# Altium PCB Single_ETU_b_rev1.PcbDoc (part 3 of 6)
Units mil, origin at the board's own origin, x right, y up, seen from the top; angles counter-clockwise.
Board outline 5341 x 2710 mil, 10 copper layers (Top Layer, GND1, Signal 1, GND2, VDDA, VDD, GND3, Signal 2, GND4, Bottom Layer), stack 59.76 mil thick; 283 components, 478 nets, 1863 pads, 875 vias.
Unrouted connection lines stored in the file: 3.
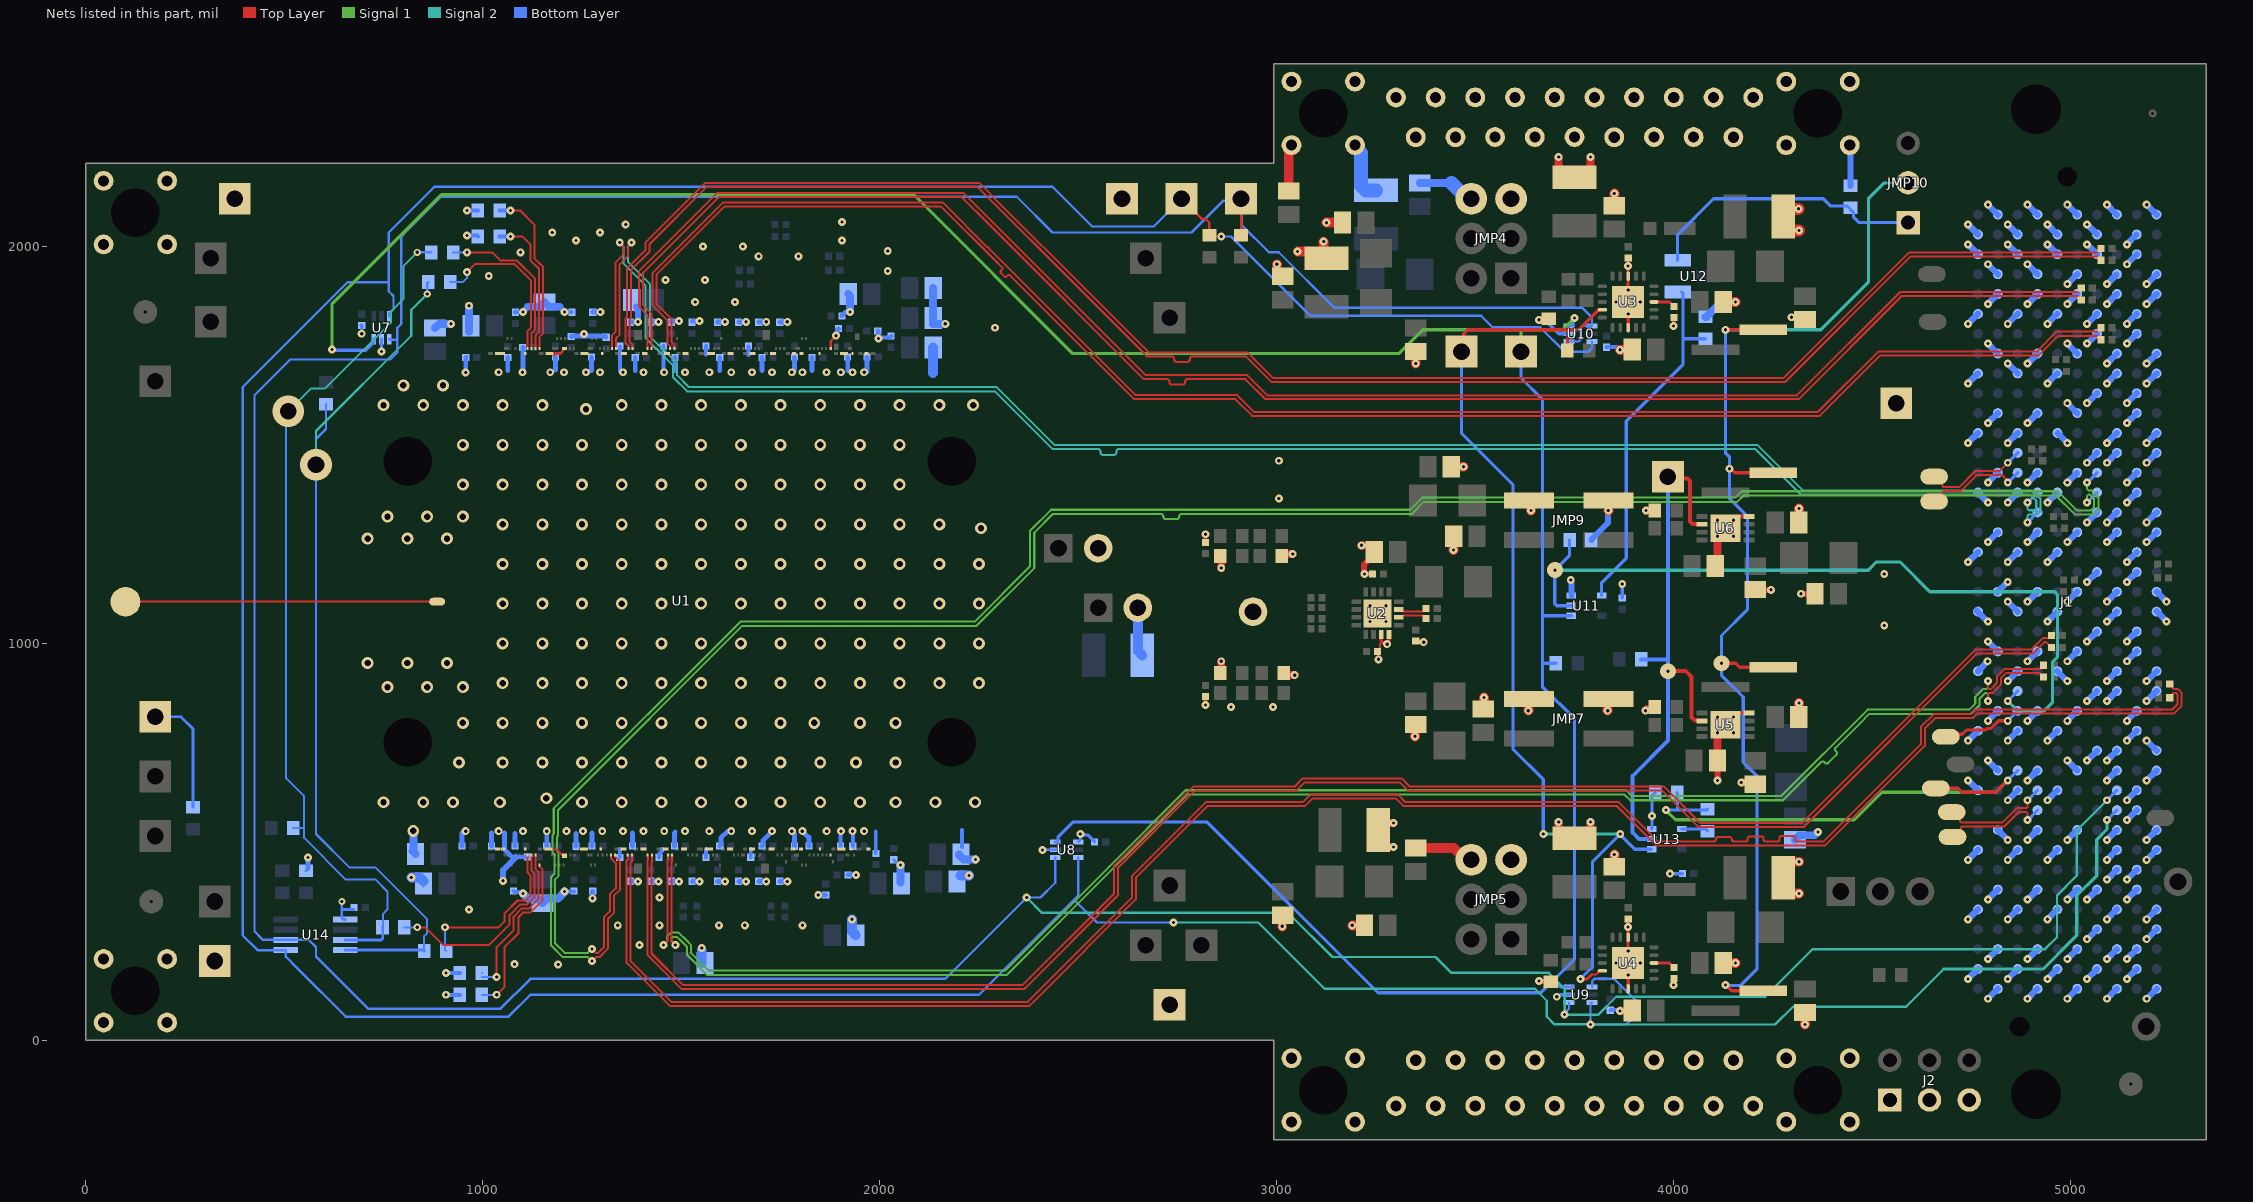
[diagram p11: the nets of this part, all layers, seen from the top]

## Via types
v1: diameter 20, hole 8, Top Layer to Bottom Layer, tented bottom, 402 vias
v2: diameter 20, hole 8, Top Layer to Bottom Layer, 199 vias
v3: diameter 30, hole 16, Top Layer to Bottom Layer, 160 vias
v4: diameter 20, hole 8, Top Layer to Bottom Layer, tented top, 89 vias
v5: diameter 18, hole 8, Top Layer to Bottom Layer, 6 vias
v6: diameter 18/25/25/25/25/18 (per signal layer), hole 8, Top Layer to Bottom Layer, tented bottom, 4 vias
v7: diameter 18/20/20/20/20/18 (per signal layer), hole 8, Top Layer to Bottom Layer, tented bottom, 4 vias
v8: diameter 80, hole 42, Top Layer to Bottom Layer, 2 vias
v9: diameter 18/25/25/25/25/18 (per signal layer), hole 8, Top Layer to Bottom Layer, 2 vias
v10: diameter 20/20/20/20/20/18 (per signal layer), hole 8, Top Layer to Bottom Layer, tented bottom, 2 vias
v11: diameter 40/20/20/20/20/40 (per signal layer), hole 8, Top Layer to Bottom Layer, 2 vias
v12: diameter 20/20/20/20/20/18 (per signal layer), hole 8, Top Layer to Bottom Layer, 1 vias
v13: diameter 40/20/20/20/20/40 (per signal layer), hole 8, Top Layer to Bottom Layer, tented top, 1 vias
v14: diameter 20, hole 8, Top Layer to Bottom Layer, tented both sides, 1 vias

## Nets (pads, with @x,y where several pads share a name; then routed paths per layer and width w, separated by ;. In a path a pad name is that pad's centre, name@x,y a point inside that pad or via, vN(x,y) a via of type N, cw(c..) or ccw(c..) an arc to the next point about the centre after c; other vN are vias at no path point) (continued)
GND: C1.2 C2.2 C3.2 C4.2 C5.2 C6.2 C7.2 C8.2 C9.2 C10.2 C11.2 C12.2 C13.2 C14.2 C15.2 C16.2 C17.2 C18.2 C19.2 C20.2 C21.2 C22.2 C23.2 C24.2 C25.2 C26.2 C27.2 C28.2 C29.2 C30.2 C31.2 C32.2 C33.2 C34.2 C35.2 C36.2 C37.2 C38.2 C39.2 C40.2 C41.2 C42.2 C43.2 C44.2 C45.2 C46.2 C47.2 C48.2 C49.2 C50.2 C51.2 C52.2 C53.2 C54.2 C55.2 C56.2 C57.2 C58.2 C59.2 C60.2 C61.2 C62.2 C63.2 C64.2 C65.2 C66.2 C67.2 C68.2 C69.2 C76.2 C77.2 C78.2 C79.2 C80.2 C81.2 C82.2 C83.2 C84.2 C85.2 C86.2 C87.2 C88.2 C89.2 C90.2 C93.2 C94.2 C95.2 C97.2 C98.2 C99.2 C100.2 C101.2 C102.2 C103.2 C104.2 C105.2 C106.2 C107.2 C108.2 C109.2 C110.2 C113.2 C114.2 C116.2 C117.2 C118.2 C119.2 C120.2 C121.2 C122.2 C123.2 C124.2 C125.2 C126.2 C128.2 C129.2 C130.2 C131.2 C132.2 C133.2 C134.2 C136.2 C137.2 C138.2 C139.2 C140.2 C157.2 C158.2 C159.2 C160.2 C161.2 C162.2 C163.2 C164.2 C175.2 C176.2 C177.2 C178.2 J1.A1 J1.A4 J1.A5 J1.A8 J1.A9 J1.A12 J1.A13 J1.A16 J1.A17 J1.A20 J1.A21 J1.A24 J1.A25 J1.A28 J1.A29 J1.A32 J1.A33 J1.A36 J1.A37 J1.A40 J1.B2 J1.B3 J1.B6 J1.B7 J1.B10 J1.B11 J1.B14 J1.B15 J1.B18 J1.B19 J1.B22 J1.B23 J1.B26 J1.B27 J1.B30 J1.B31 J1.B34 J1.B35 J1.B38 J1.B39 J1.C1 J1.C4 J1.C5 J1.C8 J1.C9 J1.C12 J1.C13 J1.C16 J1.C17 J1.C20 J1.C21 J1.C24 J1.C25 J1.C28 J1.C29 J1.C32 J1.C33 J1.C34 J1.C36 J1.C38 J1.C40 J1.D2 J1.D3 J1.D6 J1.D7 J1.D10 J1.D13 J1.D16 J1.D19 J1.D22 J1.D25 J1.D28 J1.D35 J1.D37 J1.D39 J1.E1 J1.E4 J1.E5 J1.E8 J1.E11 J1.E14 J1.E17 J1.E20 J1.E23 J1.E26 J1.E29 J1.E32 J1.E35 J1.E38 J1.E40 J1.F2 J1.F3 J1.F6 J1.F9 J1.F12 J1.F15 J1.F18 J1.F21 J1.F24 J1.F27 J1.F30 J1.F33 J1.F36 J1.F39 J1.G1 J1.G4 J1.G5 J1.G8 J1.G11 J1.G14 J1.G17 J1.G20 J1.G23 J1.G26 J1.G29 J1.G32 J1.G35 J1.G38 J1.G40 J1.H2 J1.H3 J1.H6 J1.H9 J1.H12 J1.H15 J1.H18 J1.H21 J1.H24 J1.H27 J1.H30 J1.H33 J1.H36 J1.H39 J1.J1 J1.J4 J1.J5 J1.J8 J1.J11 J1.J14 J1.J17 J1.J20 J1.J23 J1.J26 J1.J29 J1.J32 J1.J35 J1.J38 J1.J40 J1.K2 J1.K3 J1.K6 J1.K9 J1.K12 J1.K15 J1.K18 J1.K21 J1.K24 J1.K27 J1.K30 J1.K33 J1.K36 J1.K39 J2.1 J2.3 J2.5 J3.2 JMP4.5 JMP4.6 JMP5.5 JMP5.6 JMP7.3 JMP7.4 JMP9.3 JMP9.4 pad.1@45,45 pad.1@45,205 pad.1@45,2005 pad.1@45,2165 pad.1@205,45 pad.1@205,205 pad.1@205,2005 pad.1@205,2165 pad.1@3037,2255 pad.1@3037,2415 pad.1@3037,-45 pad.1@3037,-205 pad.1@3197,2255 pad.1@3197,2415 pad.1@3197,-45 pad.1@3197,-205 pad.1@3300,2375 pad.1@3300,-165 pad.1@3350,2275 pad.1@3350,-50 pad.1@3400,2375 pad.1@3400,-165 pad.1@3449.84,-49.68 pad.1@3450,2275 pad.1@3499.84,2375.32 pad.1@3499.84,-164.68 pad.1@3549.84,2275.32 pad.1@3549.84,-49.68 pad.1@3599.84,2375.32 pad.1@3599.84,-164.68 pad.1@3649.84,2275.32 pad.1@3649.84,-49.68 pad.1@3699.84,2375.32 pad.1@3699.84,-164.68 pad.1@3749.84,2275.32 pad.1@3750,-50 pad.1@3800,2375 pad.1@3800,-165 pad.1@3849.84,-49.68 pad.1@3850,2275 pad.1@3899.84,2375.32 pad.1@3899.84,-164.68 pad.1@3949.84,2275.32 pad.1@3949.84,-49.68 pad.1@3999.84,2375.32 pad.1@3999.84,-164.68 pad.1@4049.84,2275.32 pad.1@4050,-50 pad.1@4100,2375 pad.1@4100,-165 pad.1@4150,2275 pad.1@4150,-50 pad.1@4200,2375 pad.1@4200,-165 pad.1@4283,2255 pad.1@4283,2415 pad.1@4283,-45 pad.1@4283,-205 pad.1@4443,2255 pad.1@4443,2415 pad.1@4443,-45 pad.1@4443,-205 pad.4 R1.1 R2.1 R3.1 R8.1 R9.1 R10.1 R11.1 R12.1 R13.1 R14.1 R21.1 R22.1 R24.1 R26.1 R30.1 R33.1 R39.2 TP3.1 TP4.2 TP27.1 TP28.1 TP29.1 TP30.1 TP31.1 U1.3 U1.4 U1.5 U1.6 U1.14 U1.21 U1.22 U1.23 U1.24 U1.30 U1.35 U1.36 U1.37 U1.38 U1.44 U1.51 U1.52 U1.53 U1.59 U1.60 U1.61 U1.67 U1.68 U1.69 U1.75 U1.76 U1.77 U1.84 U1.85 U1.86 U1.87 U1.93 U1.94 U1.95 U1.101 U1.102 U1.103 U1.109 U1.110 U1.111 U1.117 U1.118 U1.121 U1.122 U1.128 U1.131 U1.135 U1.136 U1.137 U1.138 U1.141 U1.145 U1.146 U1.150 U1.151 U1.152 U1.153 U1.161 U1.168 U1.169 U1.170 U1.171 U1.177 U1.182 U1.183 U1.184 U1.185 U1.191 U1.198 U1.199 U1.200 U1.206 U1.207 U1.208 U1.214 U1.215 U1.216 U1.222 U1.223 U1.224 U1.231 U1.232 U1.233 U1.234 U1.240 U1.241 U1.242 U1.248 U1.249 U1.250 U1.256 U1.257 U1.258 U1.264 U1.265 U1.268 U1.269 U1.275 U1.278 U1.282 U1.283 U1.284 U1.285 U1.288 U1.292 U1.293 U2.7 U2.8 U2.17 U3.8 U3.18 U3.21 U3.V U4.8 U4.18 U4.C U4.V U5.4 U5.9 U6.4 U6.9 U7.2 U8.2 U8.4 U9.2 U10.2 U11.3 U13.3 U14.1 | length 13823.2
  Top Layer w6: U1.24@1173.5,481 1186.31,481 1199.81,467.5 ; U1.278@1876,1743 1876,1761 v1(1890,1775) ; v4@3255.5,961.5 3255.5,978.5 C69.2@3254,980 3260,986 3260,999 3263.74,1002.74 3267.22,1002.74
  Top Layer w7: 1178.56,1726 1183.06,1730.5 1195.34,1730.5 1207.34,1742.5 U1.177@1208.5,1742.5 ; U1.30@1200.34,467.5 U1.30@1208.5,467.5 ; U2.7@3263.39,1021.93 3262.48,1021.02 3262.48,1007.48 3271.96,998 3273,998 3275.71,998 3282.71,1005 U2.8@3282.68,1021.93
  Top Layer w8: U4.V@3884.72,220 v4(3884.72,285.62) C107.2@3884.72,306 ; U4.18@3884.72,260.24 U4.18@3885,259.96 ; U3.V@3884.72,1885 v4@3884.72,1955 ; U3.18@3884.72,1925.24 U3.18@3885,1924.96 ; v4(3884.72,1950.62) C88.2@3884.72,1971 ; U4.8@3885,130.04 U4.V@3885,164.49 ; U3.8@3885,1795.04 U3.V@3885,1829.49 ; v4@3999.74,139.73 C114.2@3999.74,155.74 ; U5.9@4130,795 v2(4150,815) 4159.53,824.53 U5.4@4189,824.53
  Top Layer w10: v4(2820,845) C164.2@2820,866 ; C163.2@2820,1254 v4(2820,1275) ; v4(3221,1175) C68.2@3241,1175 ; v4@3255.5,961.5 v4@3257,960 ; C76.2@3350.5,1003.5 v4@3369.5,1003.5 ; v4@3369.5,1005.5 v4@3370,1006 ; v4(3864.48,1739.47) 3894.94,1739.47 C94.2@3895.47,1740 ; v4(3999.48,139.47) v4@3999.74,139.73 ; v4(3999.48,1799.47) 3999.74,1799.73 C95.2@3999.74,1820.74 ; U6.9@4130,1290 v2(4150,1310) 4159.5,1319.5 U6.4@4189,1319.53
  Top Layer w12: C124.2@4200.47,650 C124.2@4205,645.47
  Top Layer w15: v4(3221,1175) 3220.04,1175.96 3220.04,1198.67 3245.47,1224.09 C67.2@3245.47,1230 ; v4@3660.96,149.04 3688.4,149.04 R26.1@3690,147.44 ; v2(4110,655) C125.2@4110,710 ; C132.2@4209.53,1135 v4(4245,1135) ; v4(4320,1125) C131.2@4355.47,1125
  Top Layer w20: R10.1@2860,931.68 v4(2860,955) ; v4(2860,1190) R9.1@2860,1213.32 ; R8.1@3016.68,1225 v4(3040,1225) ; R11.1@3021.68,920 v4(3045,920) ; v4(3213,1247) C67.2@3236.32,1247 ; v2(3293.62,487.41) 3273.02,487.41 3256.02,504.41 C103.2@3256.02,530 3273.44,547.41 v2(3293.62,547.41) ; v4(3660,1815) R24.1@3689.42,1815 ; C109.2@3710,527.18 v2(3710,550) ; C109.2@3710,537.18 3741.16,506.02 3750,506.02 3758.84,506.02 C109.2@3790,537.18 ; v2(3710,2225) 3710,2202.18 3741.16,2171.02 3758.84,2171.02 3790,2202.18 v2(3790,2225) ; C109.2@3790,527.18 v2(3790,550) ; JMP7.3@3833.43,858.43 JMP7.3@3835,860 ; v1(3864.48,74.47) 3894.94,74.47 C113.2@3895.47,75 ; v4(3928.43,830.47) 3932.96,835 R13.1@3958.26,835 ; v4(3930,1335) R14.1@3952.44,1335 ; C125.2@4110,710 v2(4110,775) U5.9@4130,795 ; C133.2@4110,1205 v2(4110,1270) ; v4(4170,650) C124.2@4200.47,650 ; v4(4296.2,1821.44) C80.2@4329.03,1821.44 ; C80.2@4329.03,1816.44 C80.2@4330,1815.47
  Top Layer w25: v4(3000,1955) 3000,1933.68 3009.15,1924.53 C85.2@3015,1924.53 ; v2(3013.62,287.41) 3013.62,314.1 C104.2@3015,315.47 ; C118.2@3030,2139.53 3030,2241.23 3037,2248.24 pad.1@3037,2255 ; v2@3052.97,1987.03 3090,1987.03 3107.03,1970 C84.2@3125,1970 ; C84.2@3118,1978.03 v4@3118,2011 ; v2(3125.24,2059.72) 3165.19,2059.72 C83.2@3165.47,2060 ; v2(3190,290) C110.2@3220.47,290 ; v4(3348.43,765.94) C126.2@3348.43,793.9 ; C102.2@3350,484.53 3445.59,484.53 3475.12,455 JMP5.6@3490,455 ; v4(3350,1705) C93.2@3350,1726.32 ; C134.2@3444.53,1445 v4(3470,1445) ; v4(3445,1235) C136.2@3445,1269.47 ; C128.2@3521.57,836.1 v4(3521.57,864.06) ; v4(3633.43,830.47) JMP7.4@3633.43,858.43 ; JMP9.4@3635,1360 3640,1355 v4(3640,1335) ; v4(3833.43,830.47) JMP7.3@3833.43,858.43 ; v4(3835,1335) JMP9.3@3835,1360 ; C108.2@3850,437.53 v2(3850,468) ; C89.2@3850,2102.53 v4(3850,2133) ; v4(3864.48,1739.47) C94.2@3893.9,1739.47 ; C101.2@4124.53,195 v4(4155,195) ; C82.2@4125.53,1860 v2(4155,1860) ; C138.2@4314.53,1300 C138.2@4315,1300.47 ; v4(4315,370) 4293.05,370 4276.02,387.03 C100.2@4276.02,410 4276.02,432.97 4293.05,450 v4(4315,450) ; C129.2@4315,815.47 v4(4315,850) ; C138.2@4315,1305.47 v4(4315,1340) ; v4(4330,40) C99.2@4330,70.47
  Top Layer w30: C81.2@4276.02,2075 4276.02,2080.13 4290.55,2094.65 v4(4314.35,2094.65) ; C81.2@4291.2,2040 v4(4315,2040)
  Signal 1 w20: v1(3864.48,74.47) v1@3865.01,75
  Bottom Layer w6: v1@2410.16,480.16 U8.2@2441.84,480.16 ; U8.4@2500,500 2505,505 v1(2505,520)
  Bottom Layer w7: TP3.1@175,815 240,815 270,785 R39.2@270,587.56 ; C177.2@555,427.56 C177.2@560.05,432.61 ; 645,330 C178.2@676,330 ; v5(645,350) 645,308.75 649.35,304.4 U14.1@653.8,304.4 ; C121.2@850.47,389.09 C121.2@850.47,395 C121.2@850.47,400.85 ; C162.2@2035,455 2040.5,449.5 2040.98,449.5 2048.48,442 v1(2052,442)
  Bottom Layer w8: v1(695,1780) C157.2@695,1801 ; v1(745,1735) U7.2@745,1766 ; C32.2@1990,471 1990,527 ; v1(2410,480) v1@2410.16,480.16 ; v1(2505,520) 2507.3,517.7 2523.3,517.7 2536,505 C158.2@2541,500 ; v4(3660,1815) 3675,1815 3710,1780 U10.2@3736,1780 ; v1(3705,110) 3708.25,110 3713.09,114.84 U9.2@3735.84,114.84 ; C159.2@3840,76 3841.07,77.07 3861.87,77.07 v1(3864.48,74.47) ; C175.2@3870,1114 v4(3870,1150) ; U13.3@3943.84,532.7 3945,533.85 v2(3945,565) 3945,616.38 R33.1@3953.03,624.41 ; v4(3990,420) C176.2@4022,420
  Bottom Layer w10: v1(907,115) R22.1@942.44,115 ; v1(907,170) R21.1@942.44,170 ; C34.2@957,1720 C34.2@958.5,1721.5 ; v1(960,2027) 985.44,2027 R1.1@987.44,2025 ; v1(960,2090) R2.1@987.44,2090 ; C3.2@1077,376 1079.5,373.5 v1@1100.5,373.5 ; C36.2@1082.5,1834.5 v1@1100.5,1834.5 ; 1084.07,462 C5.2@1113,462 ; v1@1205.5,375.5 C6.2@1230,375.5 ; v1@1205.5,1834.5 C39.2@1223.5,1834.5 ; C12.2@1345,461 1345,482 ; v2@1346,1685 C45.2@1346,1748 ; C16.2@1444,461 1444,470 1451,477 1451,482 ; v2@1455,1685 C49.2@1455,1749 ; C20.2@1562,461 1562,482 ; 1562,1728 C53.2@1562,1749 ; 1669,1727 C57.2@1669,1748 ; C24.2@1675,461 1675,482 ; C31.2@1901,489 v2@1901,525.11 ; C33.2@1932,489 v2@1932,526.82 ; v1(1997,1768) 1998.91,1769.91 2019.91,1769.91 2020,1770 2026,1770 C161.2@2030,1774 ; C120.2@2206.59,487.67 2206.59,529.57 ; C160.2@3830,1746 3857.95,1746 v4(3864.48,1739.47) ; v1@3861.77,74.47 v1(3864.48,74.47)
  Bottom Layer w12: C177.2@560.05,432.61 v1(560.05,460.49) ; C1.2@948,490 v2@948,522.98 ; v2@957,1687.02 C34.2@957,1720 ; C2.2@1022,490 1022,522.98 ; 1055,522.49 1055,480 1079,456 ; 1063,1687.02 C35.2@1063,1720 ; C4.2@1081,489 1081,521.98 ; C36.2@1082,1834 C36.2@1082.5,1834.5 ; v1@1100.5,1834.5 v1(1101,1835) ; v2@1101,1685.12 C37.2@1101,1745 ; C7.2@1161,490 v2@1161,522.98 ; 1183,1688.02 C38.2@1183,1721 ; v1@1205.5,1834.5 v1(1206,1835) ; C40.2@1223,1773 1224.47,1774.47 1260.19,1774.47 1260.66,1774 1300.97,1774 1308,1774 1310,1772 C43.2@1310,1771 ; C8.2@1235,489 1235,521.98 ; 1274,1687.02 C41.2@1274,1720 ; C10.2@1275,490 1275,522.98 ; v1(1276,358) 1276.5,358.5 1276.5,375.5 C9.2@1277,376 ; C42.2@1277,1834 1277.5,1834.5 1295.5,1834.5 v1(1296,1835) ; C44.2@1372,1809 1372.5,1809.5 1390.5,1809.5 v1(1391,1810) ; C11.2@1372.5,400.5 1390.5,400.5 v1(1391,400) ; C14.2@1377,490 1377,522.98 ; 1384,1687.02 C47.2@1384,1720 ; C46.2@1424,1809 1424.5,1809.5 1442.5,1809.5 v1(1443,1810) ; C13.2@1424.5,400.5 1442.5,400.5 v1(1443,400) ; C48.2@1475,1809 C48.2@1475.5,1809.5 ; C15.2@1475.5,400.5 1493.5,400.5 v1(1494,400) ; C48.2@1475.5,1811.5 v1@1493.5,1811.5 ; C18.2@1483,490 1483,523 1485,525 ; 1484,1687.02 C51.2@1484,1720 ; v1@1493.5,1809.5 v1@1494,1810 ; C17.2@1527.5,400.5 1545.5,400.5 v1(1546,400) ; C50.2@1527.5,1811.5 v1@1545.5,1811.5 ; v1@1545.5,1809.5 v1@1546,1810 ; C19.2@1591.5,400.5 1609.5,400.5 v1(1610,400) ; C52.2@1591.5,1809.5 1609.5,1809.5 v1(1610,1810) ; C22.2@1597,490 1600,493 1600,510 1617,527 v2(1625.92,527) ; 1597,1687.02 C55.2@1597,1720 ; C21.2@1644.5,400.5 1662.5,400.5 v1(1663,400) ; C54.2@1644.5,1809.5 1662.5,1809.5 v1(1663,1810) ; C23.2@1695.5,400.5 1713.5,400.5 v1(1714,400) ; C56.2@1695.5,1809.5 1713.5,1809.5 v1(1714,1810) ; C26.2@1703,490 1706,493 1706,504.14 v2(1728.86,527) ; 1703,1687.02 C59.2@1703,1720 ; C25.2@1748.5,400.5 1766.5,400.5 v1(1767,400) ; C58.2@1748.5,1809.5 1766.5,1809.5 v1(1767,1810) ; v2(1778.37,527) 1785,520.37 C27.2@1785,489 ; v2@1785,1688.02 C60.2@1785,1721 ; v2(1804.81,527) 1819,512.81 ; C30.2@1822,490 1822,512.81 ; 1829,1687.02 C63.2@1829,1720 ; v1(1845,366) C28.2@1864,366 ; v1@1890,1777.16 1893,1780.16 C62.2@1893,1789 ; C62.2@1893,1790 C62.2@1893,1789 ; C62.2@1896,1792 C62.2@1893,1789 ; v2@1898,1686.87 v2(1901.86,1683) ; v2@1900,525.11 v2(1901.89,527) ; C61.2@1904,1825 1914,1835 v1@1920,1835 ; 1919,1686.87 C64.2@1919,1721 ; C29.2@1920,417 v10(1940,417) ; v2@1968,1683 C66.2@1968,1720 ; C65.2@1995,1787 1996,1786 1996,1769 v1(1997,1768)
  Bottom Layer w15: v1(1051,402) 1051,428.93 1084.07,462 ; v1(1101,1835) 1113.87,1847.87 ; 1193.13,1847.87 v1(1206,1835) ; C98.2@1385.47,1849.1 1389.63,1844.94 1389.63,1837.53 1391,1836.15 v1(1391,1810) ; v4(3740.33,1159.46) 3740.33,1158.11 3742,1156.44 U11.3@3742,1120.5 ; R3.1@3792.56,1260 3792.56,1261.97 3834.04,1303.45 3834.04,1334.04 v4(3835,1335) ; pad.1@4443,2255 4445,2253 R30.1@4445,2152.43
  Bottom Layer w16: v1@4740,2006 J1.K3@4765,1981 ; v1(4741,155) J1.K39@4766,180 ; v1(4741,305) J1.K36@4766,330 ; v1(4741,455) J1.K33@4766,480 ; v1(4741,655) J1.K30@4766,630 ; v1(4741,755) J1.K27@4766,780 ; v1(4741,1205) J1.K18@4766,1230 ; v1(4741,1505) J1.K12@4766,1530 ; v1(4741,1655) J1.K9@4766,1680 ; v1(4741,1805) J1.K6@4766,1830 ; v1(4741,2055) J1.K2@4766,2030 ; J1.K21@4763,1082 v1@4788,1057 ; J1.K24@4766,930 v1@4791,955 ; J1.K15@4766,1380 v1(4791,1355) ; v1@4790,1756 J1.J8@4815,1731 ; v1(4791,105) J1.J40@4816,130 ; v1(4791,205) J1.J38@4816,230 ; v1(4791,355) J1.J35@4816,380 ; v1(4791,705) J1.J29@4816,680 ; v1(4791,805) J1.J26@4816,830 ; v1(4791,1005) J1.J23@4816,980 ; v1(4791,1255) J1.J17@4816,1280 ; v1(4791,1405) J1.J14@4816,1430 ; v1(4791,1555) J1.J11@4816,1580 ; v1(4791,1855) J1.J5@4816,1880 ; v1(4791,1955) J1.J4@4816,1930 ; v1(4791,2105) J1.J1@4816,2080 ; J1.J20@4815,1129 J1.J20@4816,1130 v1@4840,1154 ; J1.J32@4816,530 v1(4841,505) ; v1@4840,2006 J1.H3@4865,1981 ; v1(4841,155) J1.H39@4866,180 ; v1(4841,305) J1.H36@4866,330 ; v1(4841,455) J1.H33@4866,480 ; v1(4841,605) J1.H30@4866,630 ; v1(4841,755) J1.H27@4866,780 ; v1(4841,905) J1.H24@4866,930 ; v1(4841,1105) J1.H21@4866,1080 ; v1(4841,1205) J1.H18@4866,1230 ; v1(4841,1355) J1.H15@4866,1380 ; v1(4841,1505) J1.H12@4866,1530 ; v1(4841,1705) J1.H9@4866,1680 ; v1(4841,1805) J1.H6@4866,1830 ; v1(4841,2055) J1.H2@4866,2030 ; v1@4890.75,105 J1.G40@4915.75,130 ; v1(4891,205) J1.G38@4916,230 ; v1(4891,355) J1.G35@4916,380 ; v1(4891,505) J1.G32@4916,530 ; v1(4891,655) J1.G29@4916,680 ; v1(4891,805) J1.G26@4916,830 ; v1(4891,955) J1.G23@4916,980 ; v1(4891,1105) J1.G20@4916,1130 ; v1(4891,1255) J1.G17@4916,1280 ; v1(4891,1405) J1.G14@4916,1430 ; v1(4891,1555) J1.G11@4916,1580 ; v1(4891,1705) J1.G8@4916,1730 ; v1(4891,1855) J1.G5@4916,1880 ; v1(4891,1955) J1.G4@4916,1930 ; v1(4891,2105) J1.G1@4916,2080 ; v1@4940,1354 J1.F15@4965,1379 ; v1@4940,2006 J1.F3@4965,1981 ; v1(4941,155) J1.F39@4966,180 ; v1(4941,305) J1.F36@4966,330 ; v1(4941,455) J1.F33@4966,480 ; v1(4941,605) J1.F30@4966,630 ; v1(4941,755) J1.F27@4966,780 ; v1@4941,1056 v1(4941,1055) J1.F21@4966,1080 ; v1(4941,1205) J1.F18@4966,1230 ; v1(4941,1655) J1.F9@4966,1680 ; v1(4941,1805) J1.F6@4966,1830 ; v1(4941,2055) J1.F2@4966,2030 ; J1.F24@4966,930 v1(4991,905) ; J1.F12@4967,1529 v1@4992,1504 ; v1@4990,1404 J1.E14@5015,1429 ; v1(4991,105) J1.E40@5016,130 ; v1(4991,205) J1.E38@5016,230 ; v1(4991,355) J1.E35@5016,380 ; v1(4991,505) J1.E32@5016,530 ; v1(4991,705) J1.E29@5016,680 ; v1(4991,805) J1.E26@5016,830 ; v1(4991,955) J1.E23@5016,980 ; v14(4991,1105) J1.E20@5016,1130 ; v1(4991,1255) J1.E17@5016,1280 ; v1(4991,1605) J1.E11@5016,1580 ; v1(4991,1755) J1.E8@5016,1730 ; v1(4991,1855) J1.E5@5016,1880 ; v1(4991,1905) J1.E4@5016,1930 ; v1(4991,2105) J1.E1@5016,2080 ; v1(5041,155) J1.D39@5066,180 ; v1(5041,255) J1.D37@5066,280 ; v1(5041,355) J1.D35@5066,380 ; v1(5041,705) J1.D28@5066,730 ; v1(5041,855) J1.D25@5066,880 ; v1(5041,1005) J1.D22@5066,1030 ; v1(5041,1155) J1.D19@5066,1180 ; v1(5041,1305) J1.D16@5066,1330 ; v1(5041,1455) J1.D13@5066,1480 ; v1(5041,1605) J1.D10@5066,1630 ; v1(5041,1755) J1.D7@5066,1780 ; v1(5041,1805) J1.D6@5066,1830 ; v1(5041,2005) J1.D3@5066,1980 ; v1(5041,2055) J1.D2@5066,2030 ; v1@5090,1904 J1.C4@5115,1929 ; v1(5091,105) J1.C40@5116,130 ; v1(5091,205) J1.C38@5116,230 ; v1(5091,305) J1.C36@5116,330 ; v1(5091,405) J1.C34@5116,430 ; v1(5091,455) J1.C33@5116,480 ; v1(5091,505) J1.C32@5116,530 ; v1(5091,655) J1.C29@5116,680 ; v1(5091,705) J1.C28@5116,730 ; v1(5091,855) J1.C25@5116,880 ; v1(5091,905) J1.C24@5116,930 ; v1(5091,1055) J1.C21@5116,1080 ; v1(5091,1105) J1.C20@5116,1130 ; v1(5091,1255) J1.C17@5116,1280 ; v1(5091,1305) J1.C16@5116,1330 ; v1(5091,1455) J1.C13@5116,1480 ; v1(5091,1505) J1.C12@5116,1530 ; v1(5091,1655) J1.C9@5116,1680 ; v1(5091,1705) J1.C8@5116,1730 ; v1(5091,1855) J1.C5@5116,1880 ; v1(5091,2105) J1.C1@5116,2080 ; v1@5140,2004 J1.B2@5165,2029 ; v1(5141,155) J1.B39@5166,180 ; v1(5141,205) J1.B38@5166,230 ; v1(5141,355) J1.B35@5166,380 ; v1(5141,405) J1.B34@5166,430 ; v1(5141,555) J1.B31@5166,580 ; v1(5141,605) J1.B30@5166,630 ; v1(5141,755) J1.B27@5166,780 ; v1(5141,805) J1.B26@5166,830 ; v1(5141,955) J1.B23@5166,980 ; v1(5141,1005) J1.B22@5166,1030 ; v1(5141,1155) J1.B19@5166,1180 ; v1(5141,1205) J1.B18@5166,1230 ; v1(5141,1355) J1.B15@5166,1380 ; v1(5141,1405) J1.B14@5166,1430 ; v1(5141,1555) J1.B11@5166,1580 ; v1(5141,1605) J1.B10@5166,1630 ; v1(5141,1755) J1.B7@5166,1780 ; v1(5141,1805) J1.B6@5166,1830 ; v1(5141,1955) J1.B3@5166,1980 ; v1(5191,105) J1.A40@5216,130 ; v1(5191,255) J1.A37@5216,280 ; v1(5191,305) J1.A36@5216,330 ; v1(5191,455) J1.A33@5216,480 ; v1(5191,505) J1.A32@5216,530 ; v1(5191,655) J1.A29@5216,680 ; v1(5191,755) J1.A28@5216,730 ; v1(5191,855) J1.A25@5216,880 ; v1(5191,905) J1.A24@5216,930 ; v1(5191,1255) J1.A17@5216,1280 ; v1(5191,1305) J1.A16@5216,1330 ; v1(5191,1455) J1.A13@5216,1480 ; v1(5191,1505) J1.A12@5216,1530 ; v1(5191,1655) J1.A9@5216,1680 ; v1(5191,1705) J1.A8@5216,1730 ; v1(5191,1855) J1.A5@5216,1880 ; v1(5191,1905) J1.A4@5216,1930 ; v1(5191,2105) J1.A1@5216,2080 ; J1.A21@5216,1081 v1@5241,1056 ; J1.A20@5216,1130 v1(5241,1105)
  Bottom Layer w20: v3(825,528) 825,479.47 823,477.47 C119.2@830.47,470 ; C78.2@880,1794.53 890.47,1805 v1(920,1805) ; C86.2@965,1785 v2(965,1850.47) ; v1(1101,370) 1115,356 1139.47,356 C130.2@1150,345.47 1161.65,357.13 1189.41,357.13 1206,373.72 v1(1206,375) ; 1113.87,1847.87 1143.35,1847.87 C97.2@1155,1859.53 1166.65,1847.87 1193.13,1847.87 ; C105.2@1920.47,1880 1925,1875.47 v1(1925,1835) ; C140.2@2052,397.47 v1(2052,442) ; C87.2@2134.53,1805 C106.2@2134.53,1895 ; C87.2@2135,1805 v1@2161.47,1805 ; C120.2@2199.53,469 2199.53,467.19 2211.18,455.54 v1(2241.06,455.54) ; C116.2@3360,2159.53 3440.06,2159.53 ; R12.1@4080,1822.56 4081.97,1822.56 4119.41,1860 v2(4155,1860) ; C123.2@4305,505.47 4316.29,516.76 4354.76,516.76 v2(4363,525)
  Bottom Layer w25: v1(820,410) 841.32,410 C121.2@850.47,400.85 ; C137.2@1551.53,195 v1@1551.53,227.56 ; v1(1930,305) 1930.37,304.63 1930.37,274.15 C139.2@1939.53,265 ; 2134,1681 C79.2@2134,1745 ; C122.2@2203.68,415 v1(2225,415) ; J3.2@2650,1090 2650,981.02 C77.2@2661.02,970
  Bottom Layer w35: pad.1@3197,2255 3197,2250.94 3212.38,2235.56 3212.38,2153.05 3224.41,2141.02 C117.2@3250,2141.02 ; 3440.06,2159.53 3479.59,2120 JMP4.6@3490,2120
  other v1: 4891,105 1551.53,232.56 4790.52,955.05 4791,1055 5241,1055 4841,1155 4941,1355 4991,1405 4991,1505 4791,1755 2165,1805 1494,1812 1546,1812 5091,1905 4741,2005 4841,2005 4941,2005 5141,2005
  other v2: 1190,191 1080,192 1395,240 1340,290 1445,290 1595,290 1660,290 1805,290 965,330 1445,360 957,527 1040.11,527 1101,527 1161.14,527 1210.74,527 1252.04,527 1301,527 1353.09,527 1405.05,527 1457.02,527 1508.99,527 1570.55,527 1677.89,527 1866.28,527 1931,527 1960.72,527 4150,775 4110,815 4530,1045 3235,1055 3275,1055 3235,1095 3275,1095 4530,1175 4150,1270 4110,1310 3005,1365 3005,1460 957,1682 1040.09,1683 1100,1683 1170,1683 1205,1683 1260,1683 1295,1683 1353.06,1683 1405.03,1683 1457,1683 1508.97,1683 1570.53,1683 1625.9,1683 1677.87,1683 1728.83,1683 1778.35,1683 1804.79,1683 1866,1683 1930.98,1683 1960.69,1683 1255,1779 2290,1795 1535,1860 1635,1860 1460,1915 1560,1915 1015,1925 2020,1938 1695,1975 1795,1975 1095,1985 3051.97,1987.03 2020,1988 1555,2000 1655,2000 1235,2015 1905,2015 1175,2035 1295,2035 1360,2055 1905,2061
  other v3: 750,600 850,600 925,600 1043,600 1250,600 1350,600 1450,600 1550,600 1650,600 1750,600 1850,600 1950,600 2040,600 2140,600 2240,600 1160,610 940,700 1050,700 1150,700 1250,700 1350,700 1450,700 1550,700 1650,700 1750,700 1850,700 1940,700 2040,700 950,800 1050,800 1150,800 1250,800 1350,800 1450,800 1550,800 1650,800 1750,800 1835,800 1950,800 2040,800 760,890 860,890 950,890 1050,900 1150,900 1250,900 1350,900 1450,900 1550,900 1650,900 1750,900 1850,900 1950,900 2050,900 2150,900 2250,900 710,950.63 810,950.63 910,950.63 1050,1000 1150,1000 1250,1000 1350,1000 1450,1000 1550,1000 1650,1000 1750,1000 1850,1000 1950,1000 2050,1000 2150,1000 2250,1000 1050,1100 1150,1100 1250,1100 1350,1100 1450,1100 1550,1100 1650,1100 1750,1100 1850,1100 1950,1100 2050,1100 2150,1100 2250,1100 1050,1200 1150,1200 1250,1200 1350,1200 1450,1200 1550,1200 1650,1200 1750,1200 1850,1200 1950,1200 2050,1200 2150,1200 2250,1200 710,1263.74 810,1263.74 910,1263.74 2255,1290 1050,1300 1150,1300 1250,1300 1350,1300 1450,1300 1550,1300 1650,1300 1750,1300 1850,1300 1950,1300 2050,1300 2150,1300 760,1319.37 860,1319.37 950,1319.37 950,1400 1050,1400 1150,1400 1250,1400 1350,1400 1450,1400 1550,1400 1650,1400 1750,1400 1850,1400 1950,1400 2050,1400 950,1500 1050,1500 1150,1500 1250,1500 1350,1500 1450,1500 1550,1500 1650,1500 1750,1500 1850,1500 1950,1500 2050,1500 1260,1590 750,1600 850,1600 950,1600 1050,1600 1150,1600 1350,1600 1450,1600 1550,1600 1650,1600 1750,1600 1850,1600 1950,1600 2050,1600 2150,1600 2235,1600 800,1650 900,1650
  other v4: 3660,150 2885,840 2990,840 3256,960 3278,998 3370,1003 3118,2012
GTP_N: J1.G31 pad.64@4702,512.59 | length 272.6
  Top Layer w5.04: pad.64@4702,512.59 4706.51,512.59 4722.66,528.74 4722.66,535.82 4725.61,538.77 4831.87,538.77 4868.08,574.98 4888.05,574.98 4891,572.03 v1(4891,555)
  Bottom Layer w8: v1(4891,555) J1.G31@4916,580
GTP_P: J1.G30 pad.64@4700,575 | length 274.6
  Top Layer w5.04: pad.64@4700,575 4704.51,575 4720.66,558.85 4720.66,551.76 4723.61,548.81 4827.71,548.81 4863.92,585.02 4888.05,585.02 4891,587.97 v1(4891,605)
  Bottom Layer w8: v1(4891,605) J1.G30@4916,630
HIGH_I_PG: R35.1 TP9.1 U3.4 U4.4 U13.1 | length 2534.9
  Top Layer w5: 3793.5,166 3804,166 3812.71,174.71 U4.4@3820.04,174.71
  Top Layer w8: TP9.1@3465,1735 3470.92,1740.92 3470.92,1780 3480.92,1790 3736,1790 ; R35.1@3731.95,1737.96 3731.95,1785.95 3736,1790 ; v1(3765,155) 3782.5,155 3793.5,166 ; U3.4@3820.04,1840.32 3812.56,1840.32 3811.84,1839.59 3809.59,1839.59 3760,1790 3736,1790
  Signal 2 w8: v2(3671.25,520) v2(3865,520)
  Bottom Layer w8: TP9.1@3465,1735 3465,1530 3595,1400 3595,733.6 3671.14,657.46 v2@3671.14,520 ; v1(3765,155) 3795,185 3795,450 v2(3865,520) 3865,518 3901.3,481.7 U13.1@3943.84,481.7
high_voltage_bias: HV1.1 TP1.1 | length 785
  Top Layer w5: TP1.1@100,1105 HV1.1@885,1105
HTP_N: J1.H14 pad.64@4655.49,1357.59 | length 263.9
  Top Layer w5.04: pad.64@4655.49,1357.59 4660,1357.59 4676.15,1373.74 4676.15,1380.82 4679.1,1383.77 4722.57,1383.77 4762.75,1423.96 4822.95,1423.96 4828.06,1423.96 4831.01,1421.01 4831.01,1419.04 4841,1409.05 v1(4841,1405)
  Bottom Layer w8: v1(4841,1405) J1.H14@4866,1430
HTP_P: J1.H13 pad.64@4655.49,1420 | length 261.2
  Top Layer w5.04: pad.64@4655.49,1420 4660,1420 4676.15,1403.85 4676.15,1396.76 4679.1,1393.81 4718.41,1393.81 4758.6,1434 4820,1434 v1(4841,1455)
  Bottom Layer w8: v1(4841,1455) J1.H13@4866,1480
I2C_SCL: J1.C30 R20.2 TP6.1 U7.1 U8.1 U9.1 U10.1 U10.4 U14.6 | length 11177.2
  Top Layer w6: TP6.1@2900,2110 TP6.1@2910,2120 R20.2@2910,2027.56
  Signal 2 w6: v2(2370,360) 2408.84,321.16 3028.84,321.16 3140,210 3400,210 3440,170 3685,170 3725,130 v1(3725,65) 3810,65 3855,110 4230,110 4350,230 4935,230 4965,260 4965,365 5015,415 5015,529 v1(5091,605)
  Bottom Layer w6: U7.1@764.68,1766 766.89,1766 767.68,1765.21 781.49,1765.21 785,1761.69 ; U8.1@2442,460.63 2442,397 2405,360 v2(2370,360) 2165,155 1150,155 1120,155 1045,80 711.16,80 580,211.16 580,235 561.8,253.2 U14.6@504.2,253.2 446.8,253.2 425,275 425,1625 515,1715 766.17,1715 785,1733.83 785,1761.69 ; v1(3725,65) 3725,68.79 3736,79.79 U9.1@3736,95.32 ; U10.1@3736,1760.32 3760.32,1760.32 3765,1765 3765,1795 3769.69,1799.69 U10.4@3794,1799.69 3794,1821 3770,1845 3145,1845 3005,1985 2980,1985 2910,2055 TP6.1@2910,2120 2904.52,2114.52 2864.52,2114.52 2785,2035 2435,2035 2345,2125 895,2125 808,2038 795,2025 795,1805 785,1795 785,1761.69
  Bottom Layer w8: v1(5091,605) J1.C30@5116,630
I2C_SCL_1p2: R16.1 R18.1 R37.2 U14.3 | length 2199.2
  Signal 2 w5.04: v8(510,1585) 566.81,1641.81 601.81,1641.81 769.09,1809.09 769.09,1836.25 800,1867.15 800,1950 v5(835,1985)
  Bottom Layer w5.04: v8(510,1585) 505,1580 505,660 550,615 550,534.43 ; R37.2@522.56,535 549.43,535 550,534.43 ; R18.1@748.2,284.24 748.2,318.2 760,330 760,375 730,405 655,405 550,510 550,534.43
  Bottom Layer w6: v5(835,1985) R16.1@870,1985
  Bottom Layer w7: U14.3@653.8,253.2 744.1,253.2 748.2,257.3 748.2,284.24 R18.1@747.44,285
I2C_SCL_B: R18.2 U1.16 | length 519.2
  Top Layer w5: U1.16@1123,467 1123,427.24 1129.93,420.31 1129.93,420.2
  Top Layer w5.04: v1(835,285) 855,285 900,240 1015,240 1067.51,292.51 1067.51,315.75 1094.25,342.49 1112.39,342.49 1129.99,360.09 1129.99,420.13 1129.93,420.2
  Bottom Layer w5.04: R18.2@802.56,285 v1(835,285)
I2C_SCL_T: R16.2 U1.163 | length 413.3
  Top Layer w5: U1.163@1123,1743 1123,1782.81 1131.93,1791.73 1131.93,1791.81
  Top Layer w5.04: v1(960,1985) 1023.73,1985 1043.73,1965 1085,1965 1131.93,1918.07 1131.93,1791.81
  Bottom Layer w5.04: R16.2@925.12,1985 v1(960,1985)
I2C_SDA: J1.C31 R19.2 TP5.1 U7.6 U8.6 U9.4 U9.6 U10.6 U14.5 | length 11337.8
  Top Layer w6: TP5.1@2760,2120 2810,2070 2820,2070 2830,2060 R19.2@2830,2027.56 2832.56,2025 v4(2860,2025)
  Signal 2 w6: v2(2740,297) 2953.05,296.95 3120,130 3650,130 3680,100 3680,60 3699.49,40.51 v2@3790,40.51 ; v2(3790,40) 4255,40 4300,85 4585,85 4680,180
  Signal 2 w8: 4680,180 4930,180 5015,265 5015,365 5065,415 5065,505.87 5091,531.87 v1(5091,555)
  Bottom Layer w6: U7.6@764.68,1824 U7.6@764.68,1831.5 ; U7.6@769.09,1835.91 775,1841.82 775,1875 763,1887 763,1910 ; U8.6@2500,460.63 2500,365 2489.48,354.48 ; v2(2740,297) 2547.02,296.95 2489.48,354.48 ; TP5.1@2760,2120 2690,2050 2535,2050 2435,2150 878,2150 763,2035 763,1910 ; v4(2860,2025) 2885,2025 3085,1825 3515,1825 3544.05,1795.95 3663.68,1795.95 3724.63,1735 3785,1735 3794,1744 U10.6@3794,1760.32 ; v2(3790,40) 3790,92.32 3793,95.32 U9.6@3794,95.32 ; v2@3790.52,40 3880,40 3905,65 3905,100 3850,155 3800,155 3794.5,149.5 3794.5,135.19 U9.4@3794,134.69 ; 763,1910 660,1910 395.2,1645.2 395.2,265 432.6,227.6 U14.5@504.2,227.6 504.2,210.8 535,180 655,60 1065,60 1120,115 1150,115 2250,115 2489.48,354.48
  Bottom Layer w8: v1(5091,555) J1.C31@5116,580
I2C_SDA_1p2: R15.1 R17.1 R36.2 U14.4 | length 2321.7
  Signal 2 w6: v8(580,1450) 580,1535 820,1775 820,1840 v5(860,1880)
  Bottom Layer w5.04: v8(580,1450) 580,520 665,435 730,435 860,305 860,270 852.44,262.44 R17.1@852.44,225
  Bottom Layer w6: v8(580,1450) 580,1515 605,1540 R36.2@605,1602.44 ; v5(860,1880) 860,1907.56 R15.1@862.44,1910
  Bottom Layer w8: U14.4@653.8,227.6 849.84,227.6 R17.1@852.44,225
I2C_SDA_B: R17.2 U1.15 | length 426.3
  Top Layer w5: 1113,423 U1.15@1113,467
  Top Layer w5.04: v1(905,285) 1040,285 1055,300 1055,320 1087.48,352.48 1108.26,352.48 1120,364.22 1120,416 1113,423
  Bottom Layer w5.04: v1(905,285) 905,227.56 R17.2@907.56,225
I2C_SDA_T: R15.2 U1.162 | length 422.9
  Top Layer w5: U1.162@1113,1743 1113,1787
  Top Layer w5.04: v1(960,1935) 980,1955 1080,1955 1121.94,1913.06 1121.94,1795.94 1118.52,1792.52 1113,1787
  Bottom Layer w5.04: R15.2@917.56,1910 950,1910 960,1920 v1(960,1935)
IN_N: C73.2 U2.10 | length 74
  Top Layer w5: U2.10@3307.09,1065.63 3312.6,1065.63 3317.44,1070.47 3346.53,1070.47 ; 3346.56,1070.5 3366.57,1070.5 3367.57,1069.5 3369.5,1069.5 C73.2@3376,1063
IN_P: C72.2 U2.11 | length 74
  Top Layer w5: U2.11@3307.09,1085.32 3312.6,1085.32 3317.44,1080.47 3342.39,1080.47 ; 3342.41,1080.5 3366.57,1080.5 3367.57,1081.5 3369.5,1081.5 C72.2@3376,1088
LDO_ENABLE: JMP2.2 JMP3.2 JMP6.2 JMP8.2 JMP10.2 | length 2976.5
  Top Layer w5.04: JMP2.2@4224.87,1789.87 JMP2.2@4225,1790
  Top Layer w8: v13(4119.87,949.87) 4155.49,949.87 4165.36,940 JMP6.2@4250,940 ; v4(4129.87,139.87) 4131.24,139.87 4146.11,125 JMP3.2@4225,125 ; v4(4129.87,1789.87) JMP2.2@4224.87,1789.87 ; v4(4139.87,1439.87) 4143.12,1439.87 4152.99,1430 JMP8.2@4250,1430
  Signal 2 w8: v4(4129.87,1789.87) 4327.37,1789.87 4327.5,1790 4370,1790 4490,1910 4490,2120 4530,2160 JMP10.2@4590,2160
  Bottom Layer w8: v4(4129.87,139.87) 4131.74,138 4167.59,138 4209.79,180.21 4209.79,665.36 4175,700.15 4175,865 4119.87,920.13 v13(4119.87,949.87) 4119.87,979.87 4120,980 4120,1020 4185.25,1085.25 4185.25,1320.49 4139.87,1365.87 v4(4139.87,1439.87) 4139.87,1470.13 4129.87,1480.13 v4(4129.87,1789.87)
LED: J1.H26 pad.64@4685,765 | length 208.5
  Top Layer w8: pad.64@4681.88,771.12 4726.12,771.12 4737,782 4785.68,782 4789.68,786 4798.87,786 4817.87,805 v1(4841,805)
  Bottom Layer w8: v1(4841,805) J1.H26@4866,830
LOW_I_PG: R32.2 TP16.1 U5.6 U6.6 U13.2 | length 1448.6
  Top Layer w10: v11(3985,930) 4030,930 4045,915 4045,813.7 4047,811.7 4052.86,805.84 4070,805.84 U5.6@4071,804.84 ; TP16.1@3985,1420 3990,1415 4034.86,1415 4040.71,1409.14 4040.71,1306.99 4041,1306.7 4046.86,1300.84 4070,1300.84 U6.6@4071,1299.84
  Bottom Layer w10: R32.2@3917.56,960 3982.32,960 3985,962.68 ; U13.2@3943.84,507.2 3912.8,507.2 3896.45,523.55 3896.45,666.45 3985,755 v11(3985,930) 3985,962.68 ; TP16.1@3985,1420 3985,962.68
NetC95_1: C95.1 U3.13 | length 54.6
  Top Layer w8: U3.13@3949.96,1860 3989,1860 C95.1@4000,1849
NetC114_1: C114.1 U4.13 | length 54.6
  Top Layer w8: U4.13@3949.96,195 3989,195 C114.1@4000,184
NetR1_2: R1.2 U1.164 | length 360.5
  Top Layer w5: v1(1070,2025) 1100,2025 1120,2005 1120,1965 1141.96,1943.04 1141.96,1887 ; U1.164@1133,1743 1133,1776.14 1141.96,1785.11 1141.96,1787.58
  Top Layer w5.04: 1141.96,1787.58 1141.96,1887
  Bottom Layer w10: R1.2@1042.56,2025 v1(1070,2025)
NetR2_2: R2.2 U1.165 | length 426.8
  Top Layer w5: U1.165@1143,1743 1143,1772 1152,1781
  Top Layer w5.04: v1(1070,2090) 1095,2090 1130,2055 1130,1970 1152,1948 1152,1781
  Bottom Layer w10: R2.2@1042.56,2090 v1(1070,2090)
NetR12_2: R12.2 U11.4 U12.G | length 908.1
  Bottom Layer w8: U11.4@3818,1120.5 3818,1152.78 3880,1214.78 3880,1560 4023.44,1703.44 4023.44,1768.68 ; U12.G@4020,1885 4023.44,1881.56 4023.44,1768.68 ; R12.2@4080,1767.44 4024.68,1767.44 4023.44,1768.68
NetR21_2: R21.2 U1.17 | length 401.4
  Top Layer w5: U1.17@1133,467 1133,431.38 1139.96,424.42 1139.96,422.42
  Top Layer w5.04: v1(1035,160) 1035,235 1077.49,277.49 1077.49,311.62 1098.38,332.51 1116.53,332.51 1139.97,355.95 1139.97,422.4
  Bottom Layer w5.04: R21.2@997.56,160 v1(1035,160)
NetR22_2: R22.2 U1.18 | length 425.6
  Top Layer w5: U1.18@1143,442 1143,438 1150,431
  Top Layer w5.04: v1(1035,115) 1054.17,134.17 1054.17,234.17 1090,270 1090,310 1102.52,322.52 1120.67,322.52 1150,351.85 1150,431
  Bottom Layer w5.04: R22.2@997.56,115 v1(1035,115)
NetR34_2: R34.2 U13.4 | length 67.3
  Bottom Layer w8: U13.4@4019.84,532.7 4079.74,532.7 R34.2@4085,527.44
NetU1_D1: 
NetU1_D2: 
NetU1_D3: 
NetU1_D4: 
NetU1_D5: 
NetU1_D6: 
NetU1_D7: 
NetU1_D8: 
NetU1_D9: 
NetU1_D10: 
NetU1_D11: 
NetU1_D12: 
NetU1_D13: 
NetU1_D14: 
NetU1_D15: 
NetU1_D16: 
NetU1_D17: 
NetU1_D18: 
NetU1_D19: 
NetU1_D20: 
NetU1_D21: 
NetU1_D22: 
NetU1_D23: 
NetU1_D24: 
NetU1_D25: 
NetU1_D26: 
NetU1_D27: 
NetU1_D28: 
NetU1_D29: 
NetU1_D30: 
NetU1_D31: 
NetU1_D32: 
NetU1_D33: 
NetU1_D34: 
NetU1_D35: 
NetU1_D36: 
NetU1_D37: 
NetU1_D38: 
NetU1_D39: 
NetU1_D40: 
NetU1_D41: 
NetU1_D42: 
NetU1_D43: 
NetU1_D44: 
NetU1_D45: 
NetU1_D46: 
NetU1_D47: 
NetU1_D48: 
NetU1_D49: 
NetU1_D50: 
NetU1_D51: 
NetU1_D52: 
NetU1_D53: 
NetU1_D54: 
NetU1_D55: 
NetU1_D56: 
NetU1_D57: 
NetU1_D58: 
NetU1_D59: 
NetU1_D60: 
NetU1_D61: 
NetU1_D62: 
NetU1_D63: 
NetU1_D64: 
NetU1_D65: 
NetU1_D66: 
NetU1_D67: 
NetU1_D68: 
NetU1_D69: 
NetU1_D70: 
NetU1_D71: 
NetU1_D72: 
NetU1_D73: 
NetU1_D74: 
NetU1_D75: 
NetU1_D76: 
NetU1_D77: 
NetU1_D78: 
NetU1_D79: 
NetU1_D80: 
NetU1_D81: 
NetU1_D82: 
NetU1_D83: 
NetU1_D84: 
NetU1_D85: 
NetU1_D86: 
NetU1_D87: 
NetU1_D88: 
NetU1_D89: 
NetU1_D90: 
NetU1_D91: 
NetU1_D92: 
NetU1_D93: 
NetU1_D94: 
NetU1_D95: 
NetU1_D96: 
NetU1_D97: 
NetU1_D98: 
NetU1_D99: 
NetU1_D100: 
NetU1_D101: 
NetU1_D102: 
NetU1_D103: 
NetU1_D104: 
NetU1_D105: 
NetU1_D106: 
NetU1_D107: 
NetU1_D108: 
NetU1_D109: 
NetU1_D110: 
NetU1_D111: 
NetU1_D112: 
NetU1_D113: 
NetU1_D114: 
NetU1_D115: 
NetU1_D116: 
NetU1_D117: 
NetU1_D118: 
NetU1_D119: 
NetU1_D120: 
NetU1_D121: 
NetU1_D122: 
NetU1_D123: 
NetU1_D124: 
NetU1_D125: 
NetU1_D126: 
NetU1_D127: 
NetU1_D128: 
NetU1_D129: 
NetU1_D130: 
NetU1_D131: 
NetU1_D132: 
NetU1_D133: 
NetU1_D134: 
NetU1_D135: 
NetU1_D136: 
NetU1_D137: 
NetU1_D138: 
NetU1_D139: 
NetU1_D140: 
NetU1_D141: 
NetU1_D142: 
NetU1_D143: 
NetU1_D144: 
NetU1_D145: 
NetU1_D146: 
NetU1_D147: 
NetU1_D148: 
NetU1_D149: 
NetU1_D150: 
NetU1_D151: 
NetU1_D152: 
NetU1_D153: 
NetU1_D154: 
NetU1_D155: 
NetU1_D156: 
NetU1_D157: 
NetU1_D158: 
NetU1_D159: 
NetU1_D160: 
NetU1_D161: 
NetU1_D162: 
NetU1_D163: 
NetU1_D164: 
NetU1_D165: 
NetU1_D166: 
NetU1_D167: 
NetU1_D168: 
NetU1_D169: 
NetU1_D170: 
NetU1_D171: 
NetU1_D172: 
NetU1_D173: 
NetU1_D174: 
NetU1_D175: 
NetU1_D176: 
NetU1_D177: 
NetU1_D178: 
NetU1_D179: 
NetU1_D180: 
NetU1_D181: 
NetU1_D182: 
NetU1_D183: 
NetU1_D184: 
NetU1_D185: 
NetU1_D186: 
NetU1_D187: 
NetU1_D188: 
NetU1_D189: 
NetU1_D190: 
NetU1_D191: 
NetU1_D192: 
NetU1_D193: 
NetU1_D194: 
NetU1_D195: 
NetU1_D196: 
NetU1_D197: 
NetU1_D198: 
NetU1_D199: 
NetU1_D200: 
NetU1_D201: 
NetU1_D202: 
NetU1_D203: 
NetU1_D204: 
NetU1_D205: 
NetU1_D206: 
NetU1_D207: 
NetU1_D208: 
NetU1_D209: 
NetU1_D210: 
NetU1_D211: 
NetU1_D212: 
NetU1_D213: 
NetU1_D214: 
NetU1_D215: 
NetU1_D216: 
NetU1_D217: 
NetU1_D218: 
NetU1_D219: 
NetU1_D220: 
NetU1_D221: 
NetU1_D222: 
NetU1_D223: 
NetU1_D224: 
NetU1_D225: 
NetU1_D226: 
NetU1_D227: 
NetU1_D228: 
NetU1_D229: 
NetU1_D230: 
NetU1_D231: 
NetU1_D232: 
NetU1_D233: 
NetU1_D234: 
NetU1_D235: 
NetU1_D236: 
NetU1_D237: 
NetU1_D238: 
NetU1_D239: 
NetU1_D240: 
NetU1_D241: 
NetU1_D242: 
NetU1_D243: 
NetU1_D244: 
NetU1_D245: 
NetU1_D246: 
NetU1_D247: 
NetU1_D248: 
NetU1_D249: 
NetU1_D250: 
NetU1_D251: 
NetU1_D252: 
NetU1_D253: 
NetU1_D254: 
NetU1_D255: 
NetU1_D256: 
NetU1_D257: 
NetU1_D258: 
NetU1_D259: 
NetU1_D260: 
NetU1_D261: 
NetU1_D262: 
NetU1_D263: 
NetU1_D264: 
NetU1_D265: 
NetU1_D266: 
NetU1_D267: 
NetU1_D268: 
NetU1_D269: 
NetU1_D270: 
NetU1_D271: 
NetU1_D272: 
NetU1_D273: 
NetU1_D274: 
NetU1_D275: 
NetU1_D276: 
NetU1_D277: 
NetU1_D278: 
NetU1_D279: 
NetU1_D280: 
NetU1_D281: 
NetU1_D282: 
NetU1_D283: 
NetU1_D284: 
NetU1_D285: 
NetU1_D286: 
NetU1_D287: 
NetU1_D288: 
NetU1_D289: 
NetU1_D290: 
NetU1_D291: 
NetU1_D292: 
NetU1_D293: 
NetU1_D294: 
OVERTEMP_N: R31.1 TP26.1 U7.3 U8.3 U9.3 U10.3 U11.1 | length 7062.9
  Signal 1 w8: v2(620,1740) 620,1854.28 895.72,2130 2086.28,2130 2486.28,1730 3307.12,1730 3367.12,1790 3615,1790 ; TP26.1@3615,1735 3615,1790 ; v1(3750,1820) 3720,1790 3615,1790
  Bottom Layer w6: U10.3@3736,1799.69 3743.5,1799.69 3746.5,1802.69 3746.5,1812.71 3750,1816.21 v1(3750,1820) ; U9.3@3742,134.69 U9.3@3745,137.69
  Bottom Layer w8: v2(620,1740) 621.81,1738.19 705,1738.19 725.31,1758.5 U7.3@725.31,1766 ; U8.3@2442,500 2447.12,500 2449.12,502 2449.12,513.31 2485.8,550 2824.92,550 3254.92,120 3665,120 3697,152 ; TP26.1@3615,1735 3615,1668.48 3669,1614.49 3669,1072.63 ; R31.1@3702.44,950 3671.97,950 3669,947.03 ; U9.3@3736,134.69 3714.31,134.69 3697,152 ; U11.1@3742,1069.5 3672.13,1069.5 3669,1072.63 ; 3669,947.03 3669,1072.63 ; 3669,947.03 3669,890.92 3750,809.92 3750,205 3697,152
PG: J1.H29 pad.64@4660,635 R33.2 R34.1 | length 1296.1
  Top Layer w8: pad.64@4660,635 4715,635 4725,625 4811,625 v1(4841,655)
  Signal 1 w8: v2(3980,580) 4004.3,555.7 4454.09,555.7 4523.39,625 4811,625 v1(4841,655)
  Bottom Layer w8: v2(3980,580) 4009.28,580 ; R33.2@4008.15,624.41 4009.28,623.28 4009.28,580 ; R34.1@4085,582.56 4082.44,580 4009.28,580 ; v1(4841,655) J1.H29@4866,680
PWR_EN: J1.H25 R3.2 U11.2 | length 1971.8
  Signal 2 w8: v11(3700.33,1184.46) 4489.46,1184.46 4510,1205 4570,1205 4645,1130 4959.04,1130 4966,1123.04 4966,965.33 4953.5,952.83 4953.5,850.67 4932.83,830 4866,830 v1(4841,855)
  Bottom Layer w8: v11@3700,1184.13 3700,1099.69 3704.69,1095 U11.2@3742,1095 ; v11(3700.33,1184.46) 3737.44,1221.57 R3.2@3737.44,1260 ; v1(4841,855) J1.H25@4866,880
RAW_LDO_ENABLE: JMP10.1 R30.2 U12.S | length 714
  Bottom Layer w8: U12.S@4009.5,1965 4009.5,2029.5 4100,2120 4375.85,2120 4393.99,2101.86 4436.14,2101.86 4452.31,2085.69 4452.31,2074.38 4466.69,2060 JMP10.1@4590,2060
RESET_B_N: J1.D15 U1.48 | length 5161.2
  Top Layer w5.04: v2(1275,200) 1275.45,200 1285.43,209.98 1294,209.98 1315,230.98 1315,305.81 1330.03,320.83 1330.03,338.54 1330.03,364.03 1346.04,380.04 1346.04,450.46 1333.52,462.98 U1.48@1333.5,467
  Signal 1 w5.16: v2(1275,200) 1274.23,200 1264.56,209.67 1201.91,209.67 1171.76,239.82 1171.76,410.7 1180.58,419.51 1180.58,468.28 1175.76,473.1 1175.76,516.76 1178.72,519.72 1178.72,584.57 1649.15,1055 2239.15,1055 2378.34,1194.19 2378.34,1283.42 2431.59,1336.66 3335.66,1336.66 3366,1367 4154.93,1367 4171.16,1383.24 4966.76,1383.24 4980.7,1369.3 5015,1335 5050.68,1335 5058.74,1343.06 5058.74,1364.23 5048.3,1374.67 5044.02,1374.67 5041,1371.65 v1(5041,1355)
  Bottom Layer w8: v1(5041,1355) J1.D15@5066,1380
RESET_B_P: J1.D14 U1.47 | length 5160.6
  Top Layer w5.04: v2(1275,230) 1275.45,230 1285.43,220.02 1289.85,220.02 1304.96,235.14 1304.96,309.96 1319.99,324.99 1319.99,364.03 1319.99,368.19 1335,383.2 1335,446.42 1323,458.42 U1.47@1323,467
  Signal 1 w5.16: v2(1275,230) 1274.23,230 1264.56,220.33 1206.33,220.33 1182.42,244.23 1182.42,406.28 1191.24,415.1 1191.24,472.7 1186.42,477.51 1186.42,512.34 1189.38,515.3 1189.38,580.15 1653.57,1044.34 2243.57,1044.34 2389,1189.77 2389,1279 2436,1326 2665.25,1326 2707.98,1326 cw(c2707.98,1319.98) 2714.01,1319.98 2714.01,1319.3 ccw(c2720.03,1319.3) 2720.03,1313.27 2748.14,1313.27 ccw(c2748.14,1319.3) 2754.17,1319.3 2754.17,1319.98 cw(c2760.19,1319.98) 2760.19,1326 2805.9,1326 3340.07,1326 3370.41,1356.34 4159.34,1356.34 4175.58,1372.58 4962.35,1372.58 5007.46,1327.46 5010.59,1324.34 5057.74,1324.34 5069.4,1336 5069.4,1368.64 5052.71,1385.33 5044.02,1385.33 5041,1388.35 v1(5041,1405)
  Bottom Layer w8: v1(5041,1405) J1.D14@5066,1430
RESET_T_N: J1.G16 U1.195 | length 4356.5
  Top Layer w5.04: U1.195@1335,1743 1335,1767.96 1344.94,1777.9 1344.94,1940.1 1344.94,1954.94 1365.53,1975.53 1365.53,1992.92 1365.08,1993.36 1365.08,1999.57 v2@1374.94,2009.42
  Signal 2 w5.16: v2(1374.94,2010) 1374.94,2009.23 1365.27,1999.56 1365.27,1960.88 1420.66,1905.49 1420.66,1773.41 1441.84,1752.24 1442.7,1752.24 1489.66,1705.28 1489.66,1675.42 1519.41,1645.66 2294.12,1645.66 2439.78,1500 4210,1500 4324.34,1385.66 4902.18,1385.66 4923.42,1364.42 4923.42,1333.94 4914.15,1324.67 4894.02,1324.67 4891,1321.65 v1(4891,1305)
  Bottom Layer w8: v1(4891,1305) J1.G16@4916,1330
RESET_T_P: J1.G15 U1.194 | length 4357.3
  Top Layer w5: U1.194@1325,1743 1325,1775.13 1334.9,1785.04
  Top Layer w5.04: 1334.9,1785.04 1334.9,1940.1 1334.9,1959.9 1354.92,1979.92 1354.92,1984.89 1354.48,1985.34 1354.48,1999.57 1349.38,2004.67 1349.38,2005.56 v2(1344.94,2010)
  Signal 2 w5.16: v2(1344.94,2010) 1344.94,2009.23 1354.61,1999.56 1354.61,1956.46 1410,1901.07 1410,1769 1437.42,1741.58 1438.28,1741.58 1479,1700.86 1479,1671 1515,1635 2289.71,1635 2435.37,1489.34 2517.24,1489.34 2549.82,1489.34 cw(c2549.82,1483.32) 2555.84,1483.32 2555.84,1481.05 ccw(c2561.86,1481.05) 2561.86,1475.03 2589.98,1475.03 ccw(c2589.98,1481.05) 2596,1481.05 2596,1483.32 cw(c2602.02,1483.32) 2602.02,1489.34 2604.6,1489.34 4205.59,1489.34 4319.93,1375 4897.76,1375 4912.76,1360 4912.76,1338.35 4909.74,1335.33 4894.02,1335.33 4891,1338.35 v1(4891,1355)
  Bottom Layer w8: v1(4891,1355) J1.G15@4916,1380
S0B_N: C150.1 U1.55 | length 4777.8
  Top Layer w5.04: U1.55@1375.5,467 1375.5,465.5 1375.27,465.27 1375.27,451.29 1372.51,448.53 1372.51,199.61 1475.12,97 2372.81,97 2635,359.19 2635,414.19 2637.94,417.13 2820.84,600.04 3065.84,600.04 3085.8,620 3304.19,620 3324.16,600.04 3856.81,600.04 3860.96,600.04 3960.52,500.48 3994.7,500.48 4100.01,500.48 ccw(c4100.01,506.49) 4106.01,506.49 cw(c4112.02,506.49) 4112.02,512.49 4140.04,512.49 cw(c4140.04,506.49) 4146.05,506.49 ccw(c4152.06,506.49) 4152.06,500.48 4180.08,500.48 ccw(c4180.08,506.49) 4186.09,506.49 4186.09,507.99 cw(c4192.09,507.99) 4192.09,514 4220.12,514 cw(c4220.12,507.99) 4226.12,507.99 4226.12,506.49 ccw(c4232.13,506.49) 4232.13,500.48 4260.16,500.48 ccw(c4260.16,506.49) 4266.16,506.49 4266.16,509.48 cw(c4272.17,509.48) 4272.17,515.48 4300.19,515.48 cw(c4300.19,509.48) 4306.2,509.48 4306.2,506.49 ccw(c4312.2,506.49) 4312.2,500.48 4354.76,500.48 4376.48,500.48 4621.96,745.96 4621.96,789.82 4654.14,822 4749,822 4761,834 5256,834 5268.15,846.15 5268.15,872.53 5265.2,875.48 5258.43,875.48 5255.48,872.53 5255.48,869.48 C150.1@5249,863
S0B_P: C149.1 U1.54 | length 4777.6
  Top Layer w5.04: U1.54@1365,467 1365.23,466.77 1365.23,455.44 1362.48,452.69 1362.48,439.33 1362.48,195.45 1470.97,86.96 2376.96,86.96 2390,100 2645.04,355.04 2645.04,410.04 2825,590 3070,590 3089.96,609.96 3300.04,609.96 3320,590 3856.81,590 3956.36,490.44 4380.64,490.44 4632,741.81 4632,785.66 4658.3,811.96 4753.16,811.96 4765.16,823.96 5260.16,823.96 5278.19,842 5278.19,876.69 5269.36,885.52 5258.43,885.52 5255.48,888.47 5255.48,891.52 C149.1@5249,898
S0T_N: C115.1 U1.202 | length 4359.5
  Top Layer w5.04: U1.202@1377,1743 1376.77,1743.23 1376.77,1753.43 1369.48,1760.71 1369.48,1814.48 1373.04,1818.04 1373.04,1940.04 1420,1987 1420,2005.81 1564.19,2150 2245.81,2150 2505.73,1890.08 2666.91,1728.89 2672.8,1723 2703.72,1723 2735.43,1723 cw(c2735.43,1717) 2741.44,1717 2741.44,1715.17 ccw(c2747.44,1715.17) 2747.44,1709.16 2775.47,1709.16 ccw(c2775.47,1715.17) 2781.48,1715.17 2781.48,1717 cw(c2787.48,1717) 2787.48,1723 2790,1723 2921.8,1723 2986.84,1657.96 4279.96,1657.96 4596.98,1974.98 5057.52,1974.98 5066.57,1974.98 5069.52,1972.03 5069.52,1971.48 C115.1@5076,1965
S0T_P: C112.1 U1.201 | length 4358.8
  Top Layer w5.04: U1.201@1366.5,1743 1366.5,1744.5 1366.73,1744.73 1366.73,1749.27 1359.44,1756.56 1359.44,1818.64 1363,1822.19 1363,1944.2 1409.96,1991.16 1409.96,2009.96 1560.04,2160.04 2249.96,2160.04 2308.94,2101.06 2515.76,1894.24 2676.96,1733.04 2925.96,1733.04 2991,1668 4275.81,1668 4592.82,1985.02 5053.36,1985.02 5066.57,1985.02 5069.52,1987.97 5069.52,1988.52 C112.1@5076,1995
S1B_N: C166.1 U1.63 | length 4306.6
  Top Layer w5.04: U1.63@1426,467 1426,465.5 1425.77,465.27 1425.77,451.29 1425.04,450.56 1425.04,218.94 1504.94,139.04 2359,139.04 2590,370.04 2590,439.19 2592.94,442.13 2790.84,640.04 3045.84,640.04 3065.84,660.04 3314.16,660.04 3334.16,640.04 3852.16,640.04 3974.16,640.04 4067.16,547.04 4322.43,547.04 4760.43,985.04 4900.84,985.04 4929.26,1013.45 4938.88,1013.45 4938.95,1013.52 4944.52,1013.52 C166.1@4951,1020
S1B_P: C165.1 U1.62 | length 4326
  Top Layer w5.04: U1.62@1415.5,467 1415.73,466.77 1415.73,455.44 1415,454.71 1415,214.78 1500.78,129 2363.16,129 2366.1,131.94 2600.04,365.88 2600.04,435.04 2795,630 3050,630 3070,650 3310,650 3330,630 3970,630 4063,537 4284,537 4326.58,537 4764.58,975 4905,975 4933.41,1003.41 4937.59,1003.41 C165.1@4951,990
S1T_N: C135.1 U1.210 | length 4240.2
  Top Layer w5.04: U1.210@1425,1743 1424.77,1743.23 1424.77,1831.23 1404,1852 1404,1934 1594,2124 2206.81,2124 2273.76,2057.05 2665.37,1665.43 2680.7,1665.43 2723.25,1665.43 cw(c2723.25,1659.43) 2729.26,1659.43 2729.26,1657.87 ccw(c2735.27,1657.87) 2735.27,1651.86 2763.29,1651.86 ccw(c2763.29,1657.87) 2769.3,1657.87 2769.3,1659.43 cw(c2775.3,1659.43) 2775.3,1665.43 2849.42,1665.43 2920.95,1665.43 2971.43,1614.96 4314.16,1614.96 4574.18,1874.98 4808.22,1874.98 4991,1874.98 5009.44,1874.98 5016.57,1874.98 5019.52,1872.03 5019.52,1871.48 C135.1@5026,1865
S1T_P: C127.1 U1.209 | length 4240
  Top Layer w5.04: U1.209@1414.5,1743 1414.5,1744.5 1414.73,1744.73 1414.73,1827.07 1393.96,1847.84 1393.96,1938.16 1589.84,2134.04 2210.96,2134.04 2669.53,1675.47 2925.11,1675.47 2975.58,1625 4310,1625 4570.02,1885.02 4574.17,1885.02 4812.38,1885.02 4991,1885.02 5005.29,1885.02 5016.57,1885.02 5019.52,1887.97 5019.52,1888.52 C127.1@5026,1895
S2B_N: C171.1 U1.71 | length 4166.4
  Top Layer w5.04: U1.71@1477,467 1477,465.5 1476.77,465.27 1476.77,451.29 1475.02,449.54 1475.02,250.43 1485,240.45 v1(1485,240) ; v1(4791,855) 4791,872.03 4793.95,874.98 4802.28,874.98 4823.48,896.18 4823.48,912.26 4836.21,924.98 4921.57,924.98 4924.52,922.03 4924.52,921.48 C171.1@4931,915
  Signal 1 w5.16: v1(1485,240) 1485,240.77 1475.33,250.44 1475.33,257.96 1478.35,260.98 1489.02,260.98 1497,253 1514.34,235.66 1514.34,215.66 1564.66,165.34 1569.07,165.34 2320.34,165.34 2453.59,298.58 2774.47,619.47 2964,619.47 3875.45,619.47 3889.93,605 4275,605 4340.49,670.49 4370.71,700.71 cw(c4374.97,696.45) 4379.23,700.71 4380.65,699.29 ccw(c4384.91,703.55) 4389.17,699.29 4409.05,719.16 ccw(c4404.79,723.42) 4409.05,727.68 4407.62,729.1 cw(c4411.88,733.36) 4407.62,737.62 4469.29,799.29 4492.58,822.58 4748.51,822.58 4769.88,843.94 4769.88,860.84 4783.7,874.67 4787.98,874.67 4791,871.65 v1(4791,855)
S2B_P: C172.1 U1.70 | length 4166.3
  Top Layer w5.04: v1(1455,240) 1455,240.45 1464.98,250.43 1464.98,453.69 1466.73,455.44 1466.73,466.77 U1.70@1466.5,467 ; v1(4791,905) 4791,887.97 4793.95,885.02 4798.12,885.02 4813.44,900.34 4813.44,916.41 4832.05,935.02 4921.57,935.02 4924.52,937.97 4924.52,938.52 C172.1@4931,945
  Signal 1 w5.16: v1(1455,240) 1455,240.77 1464.67,250.44 1464.67,262.37 1473.94,271.64 1493.43,271.64 1512.07,253 1525,240.07 1525,220.07 1569.07,176 2315.93,176 2442.93,303 2577.46,437.54 2766.94,627.01 2770.06,630.13 3879.87,630.13 3894.34,615.66 4270.59,615.66 4488.16,833.24 4744.1,833.24 4759.22,848.36 4759.22,865.26 4779.29,885.33 4787.98,885.33 4791,888.35 v1(4791,905)
S2T_N: C142.1 U1.218 | length 4238.2
  Top Layer w5.04: U1.218@1482.5,1743 1482.5,1744.46 1482.16,1744.81 1482.16,1752.95 1475.03,1760.08 1475.03,1817.97 1437.15,1855.85 1437.15,1928.15 1610,2101 2154,2101 2291.37,1963.63 2307.32,1947.68 cw(c2303.76,1944.12) 2307.32,1940.56 2304.43,1937.67 ccw(c2306.56,1935.55) 2304.43,1933.42 2314.35,1923.5 ccw(c2316.47,1925.63) 2318.6,1923.5 2321.49,1926.39 cw(c2325.05,1922.83) 2328.61,1926.39 2416,1839 2638.03,1616.97 2638.84,1616.97 2640.81,1615 2895.81,1615 2937.8,1573 2952,1573 4308,1573 4367.2,1573 4519.16,1724.96 4918.16,1724.96 4967.89,1774.7 5066.57,1774.7 5069.52,1771.75 5069.52,1771.48 C142.1@5076,1765
S2T_P: C141.1 U1.217 | length 4237.6
  Top Layer w5.04: U1.217@1472,1743 1472,1744.46 1472.12,1744.58 1472.12,1748.79 1464.99,1755.92 1464.99,1813.81 1427.11,1851.7 1427.11,1932.3 1605.84,2111.04 2158.16,2111.04 2192.1,2077.1 2242.07,2027.13 2271.16,1998.03 2271.97,1998.03 2644.96,1625.04 2899.96,1625.04 2941.96,1583.04 4363.04,1583.04 4515,1735 4914,1735 4963.73,1784.73 4966.51,1784.73 4967.08,1785.3 5066.57,1785.3 5069.52,1788.25 5069.52,1788.52 C141.1@5076,1795